# Altium PCB Saleem_PCB.PcbDoc (part 1 of 3)
Units mil, origin at the board's own origin, x right, y up, seen from the top; angles counter-clockwise.
Board outline 2705.54 x 1767 mil, 2 copper layers (Top Layer, Bottom Layer); 91 components, 66 nets, 321 pads, 111 vias.
Unrouted connection lines stored in the file: 1.
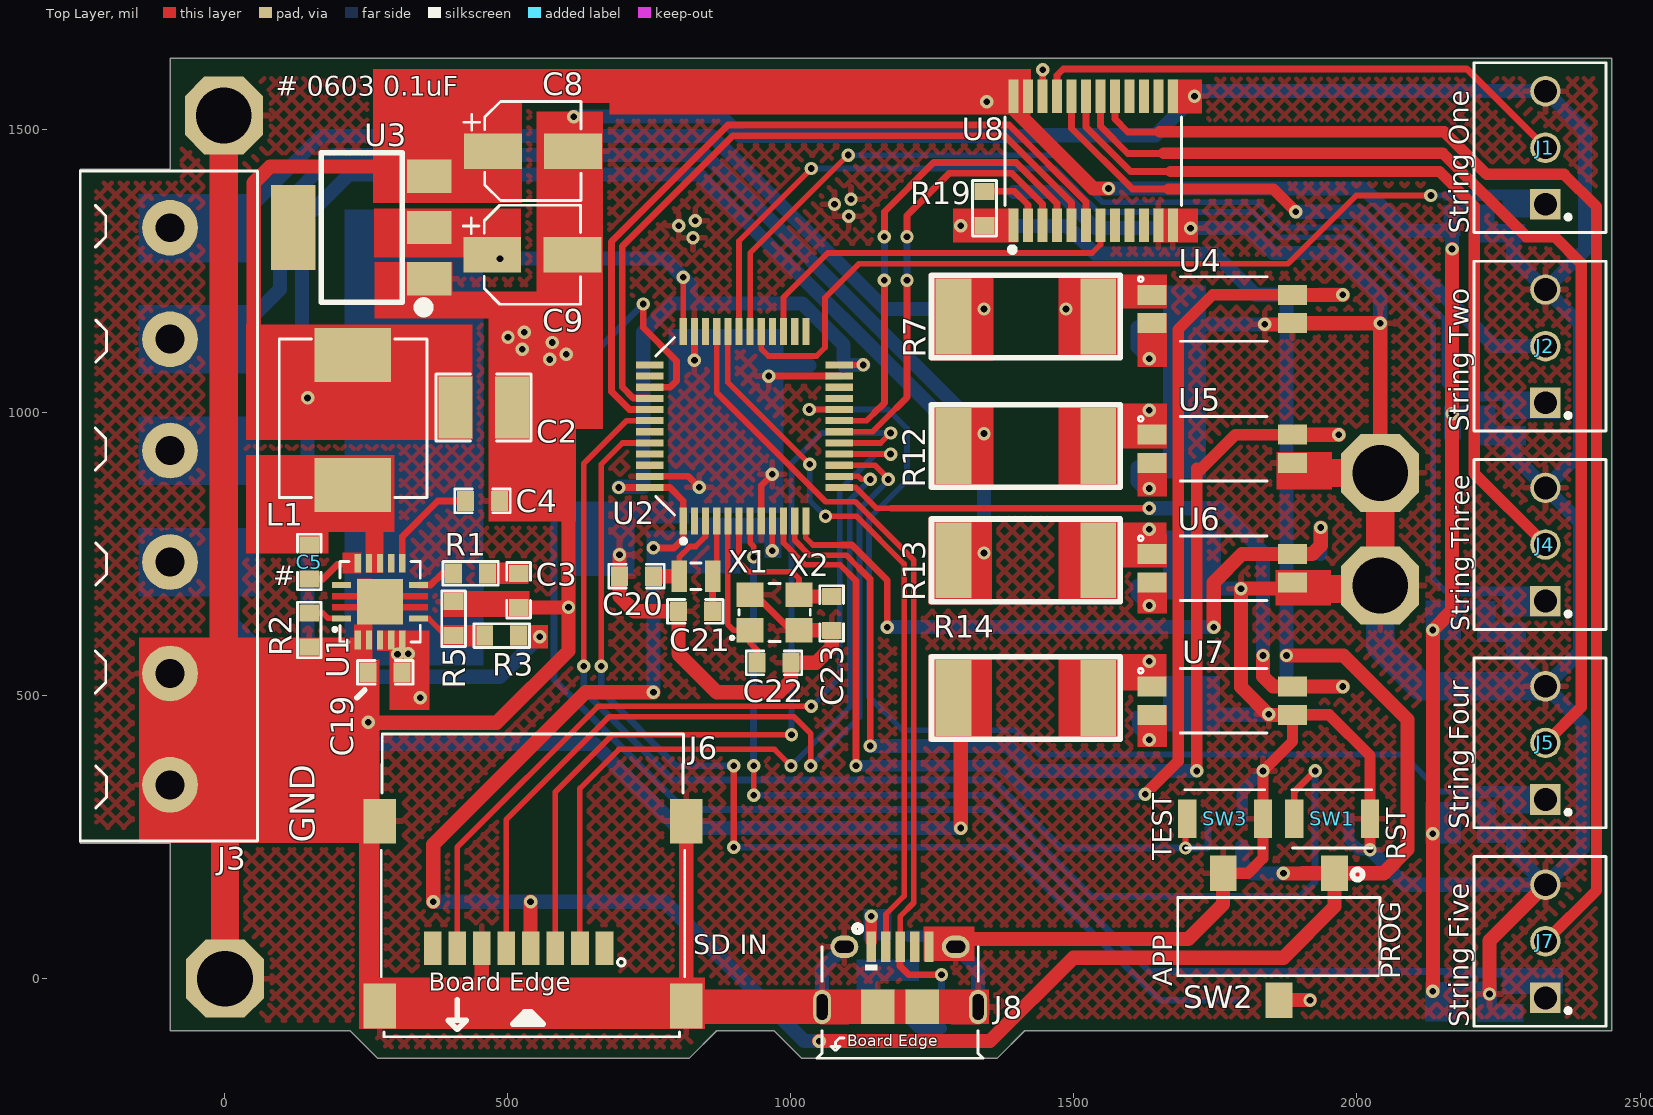
[diagram p0: Top Layer view]
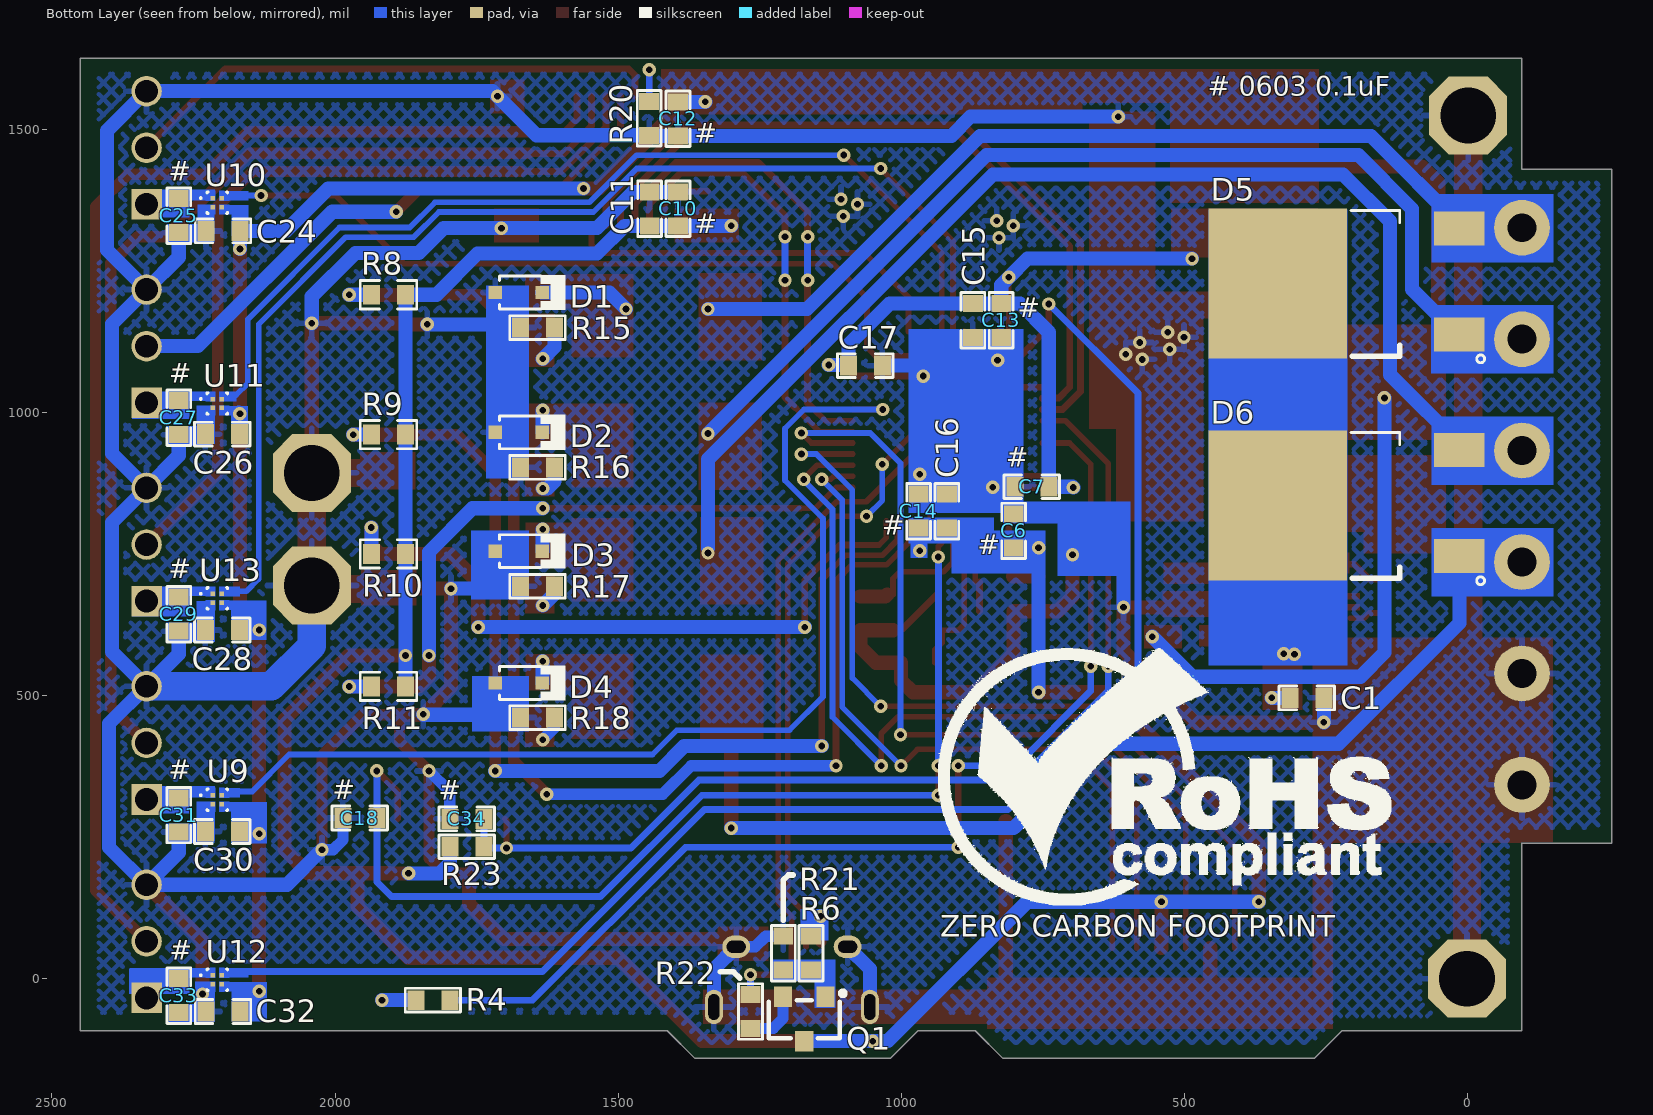
[diagram p1: Bottom Layer view, seen from below]
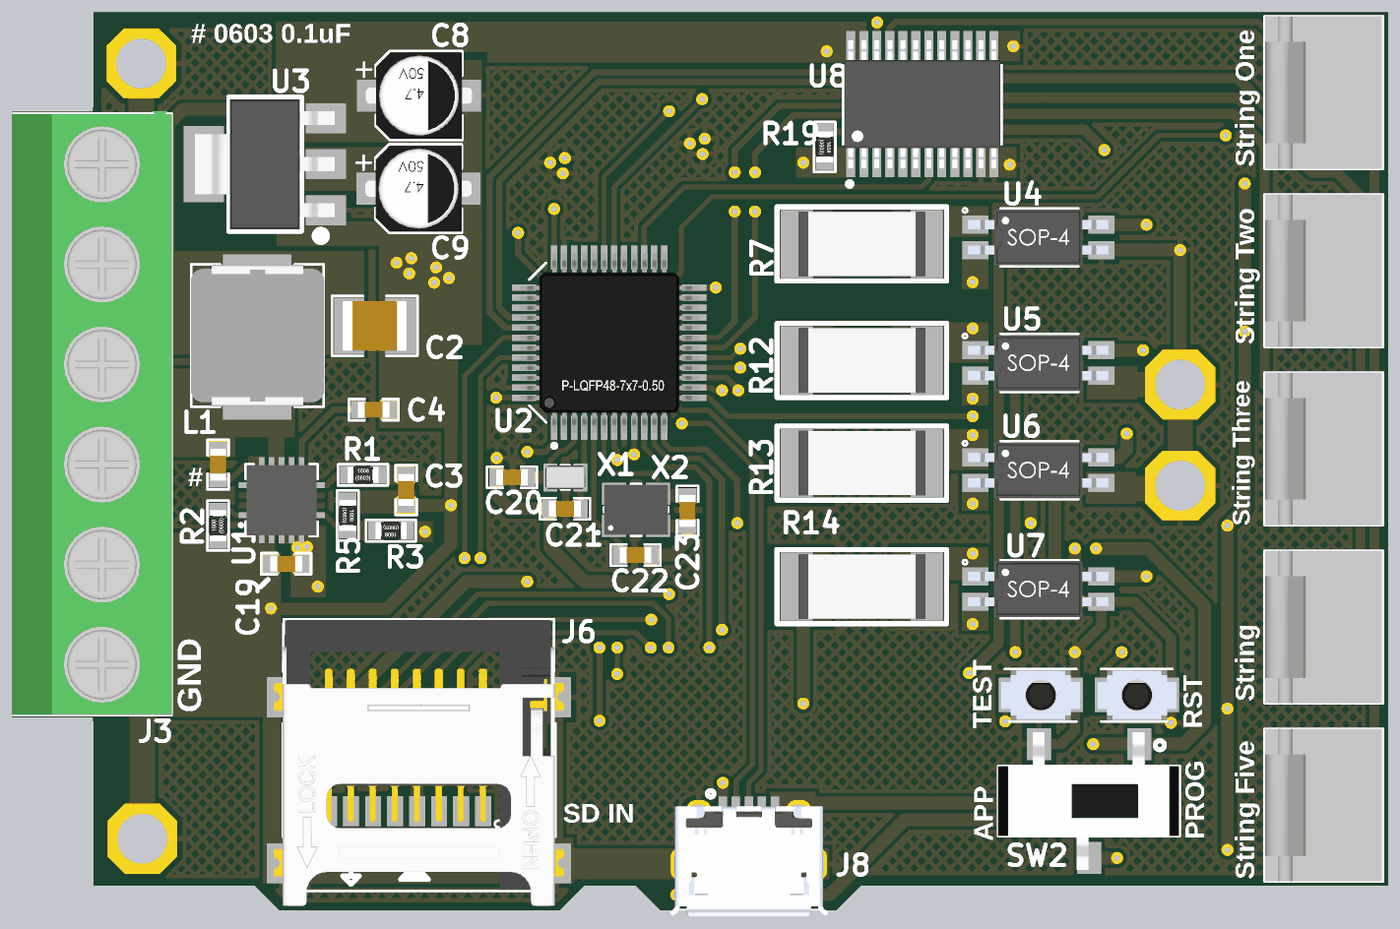
[diagram p3: 3D render of the assembled board from above, using the file's embedded part models]
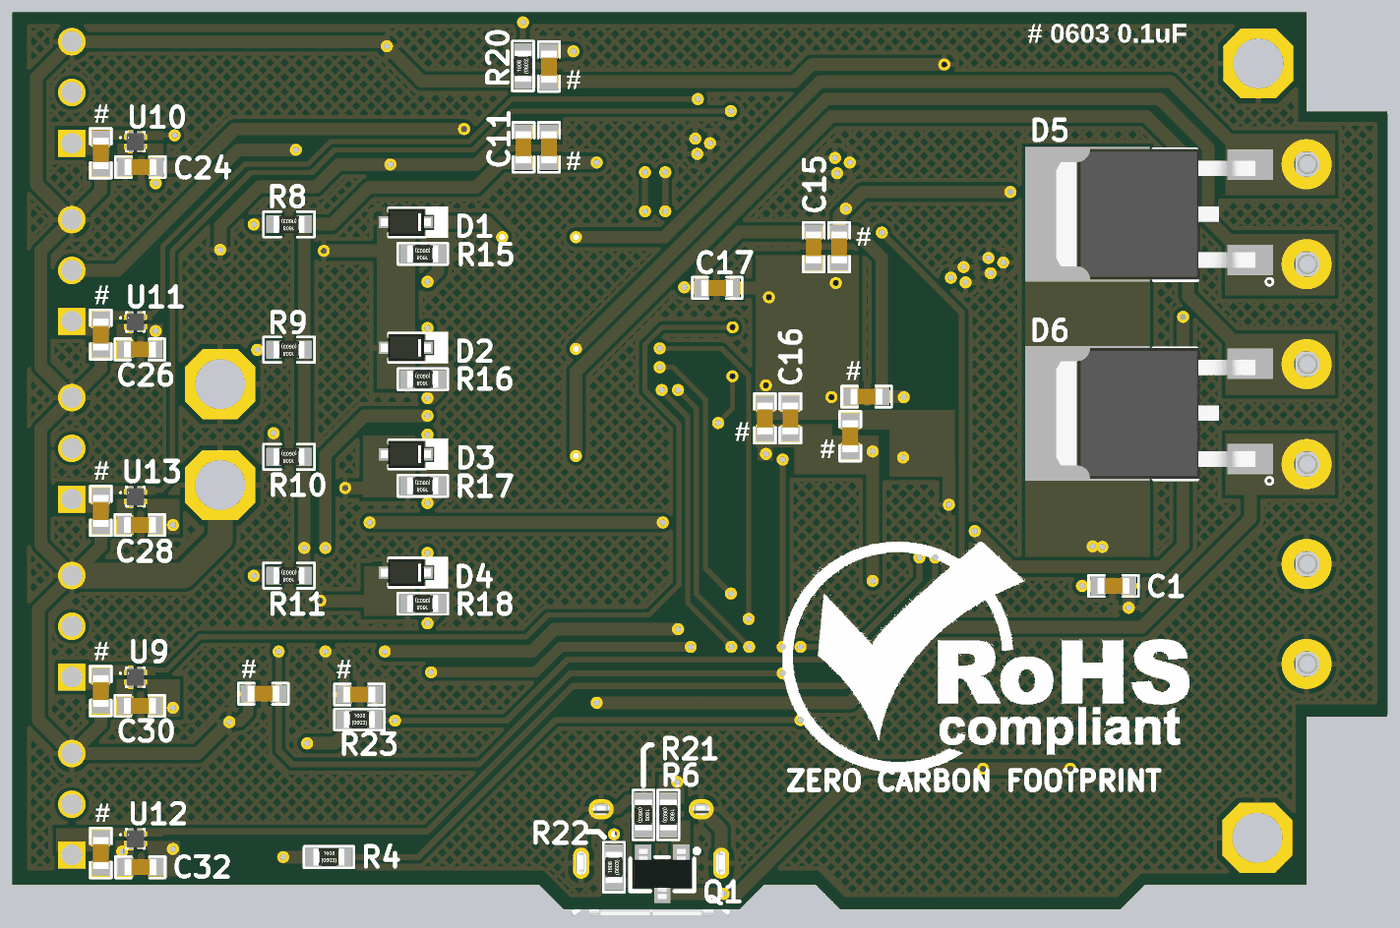
[diagram p4: 3D render of the assembled board from below, using the file's embedded part models]

## Layer stack, top to bottom
Top Solder: solder mask 0.4, Solder Resist, Dk 3.5
Top Layer: signal copper 1.4
Dielectric 1: dielectric 12.6, FR-4, Dk 4.8
Bottom Layer: signal copper 1.4
Bottom Solder: solder mask 0.4, Solder Resist, Dk 3.5

## Board outline
-97,-92 -97,239 -255.54,239 -255.54,1430 -97,1430 -97,1626 2450,1626 2450,-92 1413,-92 1364,-141 1019,-141 970,-92 869,-92 820,-141 270,-141 221,-92

## Design rules (kind name [scope] priority, off if disabled: settings)
Clearance [All] p1: gap=7 ignorepadtopadclearanceinfootprint=FALSE
ComponentClearance [All] p1: gap=0 collisioncheckmode=3 verticalgap=0 showdistances=FALSE
Height [All] p1: minheight=0 maxheight=10000 prefheight=500
HoleSize [All] p1: absolutevalues=TRUE maxlimit=1000 minlimit=1 maxpercent=80.000 minpercent=20.000
HoleToHoleClearance [All] p1: gap=1 allowstackedmicrovias=TRUE
MinimumSolderMaskSliver [All] p1: minsoldermaskwidth=0
PolygonConnect [All] p1: connectstyle=Relief reliefconductorwidth=10 reliefentries=4 polygonreliefangle="90 Angle" airgapwidth=10
RoutingVias [All] p1: holewidth=11.81 width=23.62 viastyle="Through Hole" minholewidth=11.81 minwidth=23.62 maxholewidth=31.5 maxwidth=62.99
SilkToSilkClearance [All] p1: silktosilkclearance=0
SilkToSolderMaskClearance [IsPad] p1: minsilkscreentomaskgap=0 clearancetoexposedcopper=TRUE
SolderMaskExpansion SolderMaskExpansion_1 [IsVia] p1: expansion=4 soldermaskfromhole=TRUE
SolderMaskExpansion [Not IsVia] p2: expansion=4
Width [All] p1: maxlimit=100 minlimit=8 preferedwidth=12 minimp=50.000000 maximp=50.000000 favimp=50.000000
23 further rules are at their usual default settings.

## Classes and differential pairs
component class U_Power_Section: C1 C2 C3 C4 C5 C8 C9 C19 L1 R1 R2 R3 R5 U1 U3
component class U_Opto_Section: D1 D2 D3 D4 R7 R8 R9 R10 R11 R12 R13 R14 R15 R16 R17 R18 U4 U5 U6 U7
component class U_LED_PWR_CTRL_Section: C24 C25 C26 C27 C28 C29 C30 C31 C32 C33 U9 U10 U11 U12 U13
component class U_Controller_Section: C6 C7 C13 C14 C15 C16 C17 C18 C20 C21 C22 C23 C34 R4 R23 SW1 SW2 SW3 U2 X1 X2
component class U_Connector_Section: C10 C11 C12 D5 D6 J1 J2 J3 J4 J5 J6 J7 J8 Q1 R6 R19 R20 R21 R22 U8

## Components (designator, comment, footprint, x,y, rotation, side; value= is the part's Value field where it differs from the comment)
C1 "10uF" Cap0603 283,496 r180 bottom
C2 "47uF" Cap1210 457,1009 r0 top locked
C3 "8200pF" Cap0603 519,686 r270 top locked
C4 "10000pF" Cap0603 455,844 r0 top locked
C5 "0.1uF" Cap0603 149,736 r270 top locked
C6 "0.1uF" Cap0603 801,791 r90 bottom locked
C7 "0.1uF" Cap0603 769,869 r0 bottom locked
C8 "10uF" RVT1E100M0405 544.13,1462 r0 top locked
C9 "10uF" RVT1E100M0405 543.13,1279 r0 top locked
C10 "0.1uF" Cap0603 1394,1360 r90 bottom locked
C11 "1uF" Cap0603 1444,1360 r90 bottom locked
C12 "0.1uF" Cap0603 1394,1519 r270 bottom locked
C13 "0.1uF" Cap0603 823,1163 r270 bottom locked
C14 "0.1uF" Cap0603 969,826 r90 bottom locked
C15 "1uF" Cap0603 873,1163 r270 bottom locked
C16 "4.7uF" Cap0603 919,826 r90 bottom locked
C17 "10000pF" Cap0603 1063,1083 r180 bottom locked
C18 "0.1uF" Cap0603 1956.02,283.75 r0 bottom locked
C19 "4.7uF" Cap0603 283,541 r180 top locked
C20 "10pF" Cap0603 727,711 r0 top locked
C21 "10pF" Cap0603 831,649 r0 top locked
C22 "20pF" Cap0603 970,558 r180 top locked
C23 "20pF" Cap0603 1072,645 r90 top locked
C24 "1uF" Cap0603 2198,1321 r0 bottom locked
C25 "0.1uF" Cap0603 2276,1348 r270 bottom locked
C26 "1uF" Cap0603 2199,962 r0 bottom locked
C27 "0.1uF" Cap0603 2276,991 r270 bottom locked
C28 "1uF" Cap0603 2199,616 r0 bottom locked
C29 "0.1uF" Cap0603 2276,644 r270 bottom locked
C30 "1uF" Cap0603 2199,260 r0 bottom locked
C31 "0.1uF" Cap0603 2276,289 r270 bottom locked
C32 "1uF" Cap0603 2198,-58 r0 bottom locked
C33 "0.1uF" Cap0603 2276,-30 r270 bottom locked
C34 "0.1uF" Cap0603 1767,282.25 r0 bottom locked
D1 "MM3Z3V3B" MM3Z3V3B 1675.51,1212.27 r180 bottom locked
D2 "MM3Z3V3B" MM3Z3V3B 1675.51,965.27 r180 bottom
D3 "MM3Z3V3B" MM3Z3V3B 1675.51,755.27 r180 bottom
D4 "MM3Z3V3B" MM3Z3V3B 1675.51,522.27 r180 bottom locked
D5 "VS-12CWQ06FNTR-M3" VS-12CWQ06FNTR-M3 174,1232 r90 bottom locked
D6 "VS-12CWQ06FNTR-M3" VS-12CWQ06FNTR-M3 174,840 r90 bottom locked
J1 "640456-3" 640456-3 2333,1468 r90 top locked
J2 "640456-3" 640456-3 2333,1117.5 r90 top locked
J3 "WJ126V-5.0-6P" WJ126V-5.0-6P -97,834.5 r270 top locked
J4 "640456-3" 640456-3 2333,767 r90 top locked
J5 "640456-3" 640456-3 2333,416.5 r90 top locked
J6 "TF-002T-15" TF-002T-15 670.31,54 r0 top locked
J7 "640456-3" 640456-3 2333,66 r90 top locked
J8 "10118194-0001LF" 10118194-0001LF 1192.8,56.3 r0 top locked
L1 "3.3 µH" IHLP2525CZER3R3M01 226,988 r90 top locked
Q1 "MMBT2222A-7-F" SOT-23 1171,-71 r0 bottom locked
R1 "1K69" Res0603#1 434,716 r180 top locked
R2 "100K" Res0603#1 149,616 r270 top locked
R3 "56K" Res0603#1 489,606 r0 top locked
R4 "10K" Res0603#1 1827,-38 r0 bottom locked
R5 "10K" Res0603#1 404,636 r90 top locked
R6 "10K" Res0603#1 1159,45 r90 bottom locked
R7 "390R" "RES 2512" 1415,1170 r180 top value=390O
R8 "3.3K" Res0603#2 1905.51,1208.27 r0 bottom locked
R9 "3.3K" Res0603#2 1905.51,961.27 r0 bottom locked
R10 "3.3K" Res0603#2 1905.51,750.27 r0 bottom locked
R11 "3.3K" Res0603#2 1905.51,516.27 r0 bottom locked
R12 "390R" "RES 2512" 1415,941 r180 top value=390O
R13 "390R" "RES 2512" 1415,739 r180 top value=390O
R14 "390R" "RES 2512" 1415,496 r180 top value=390O
R15 "200R" Res0603#1 1642.3,1150.27 r180 bottom locked
R16 "200R" Res0603#1 1642.3,903.27 r180 bottom locked
R17 "200R" Res0603#1 1642.3,693.27 r180 bottom locked
R18 "200R" Res0603#1 1642.3,461.27 r180 bottom locked
R19 "10K" Res0603#1 1342,1361 r90 top locked
R20 "10K" Res0603#1 1445,1520 r270 bottom locked
R21 "36K" Res0603#1 1208,45 r90 bottom locked
R22 "1.5K" Res0603#1 1266,-58 r270 bottom locked
R23 "10K" Res0603#1 1767,233 r0 bottom locked
SW1 "B3U-1000P" B3U-1000P 1956.02,282.75 r0 top locked
SW2 "SS-3235D-03-L2" SS-3235D-03-L2 1862,74 r180 top locked
SW3 "B3U-1000P" B3U-1000P 1767,282.75 r0 top locked
U1 "TPS54620RHLR" "14-VQFN (3.5x3.5)" 274,666 r90 top locked
U2 "STM32F070CBT6TR" "48-LQFP (7x7)" 918,976 r90 top locked
U3 "NCP1117LPST33T3G" SOT-223 241,1327 r90 top locked
U4 "PS2801C-1-F3-A" PS2801C-1-F3-A 1762,1183 r0 top locked
U5 "PS2801C-1-F3-A" PS2801C-1-F3-A 1762,936 r0 top locked
U6 "PS2801C-1-F3-A" PS2801C-1-F3-A 1762,725 r0 top locked
U7 "PS2801C-1-F3-A" PS2801C-1-F3-A 1762,491 r0 top locked
U8 "SN74LVC8T245PWR" 24-TSSOP 1534,1445 r90 top locked
U9 "MIC94082YFT-TR" MIC94082YFT-TR 2207.87,316.13 r180 bottom locked
U10 "MIC94082YFT-TR" MIC94082YFT-TR 2207.87,1371 r180 bottom locked
U11 "MIC94082YFT-TR" MIC94082YFT-TR 2207.87,1016.13 r180 bottom locked
U12 "MIC94082YFT-TR" MIC94082YFT-TR 2207.87,-1.87 r180 bottom locked
U13 "MIC94082YFT-TR" MIC94082YFT-TR 2207.87,671.87 r180 bottom locked
X1 "32.768 KHz" X1A000061002100 832,711 r0 top locked value=Custom
X2 "XXDCCLNANF-8.000000MHZ" XXDCCLNANF-8.000000MHZ 971,647 r0 top locked value=8000000Hz

## Footprints (in the part's own frame and the unit in brackets; to place one, negate y for a bottom-side part, rotate by r counter-clockwise, add the part's x,y. Pads: shape width x height; smd on the part's side, far side on the other; paste and mask are expansions set on the pad)
"14-VQFN (3.5x3.5)" [mm]
  rect 0.28x0.85 smd: 1(-0.75,1.725) 7(-0.75,-1.725) 8(0.75,-1.725) 14(0.75,1.725)
  rect 0.85x0.28 smd: 2(-1.725,1) 3(-1.725,0.5) 4(-1.725,0) 5(-1.725,-0.5) 6(-1.725,-1) 9(1.725,-1) 10(1.725,-0.5) 11(1.725,0) 12(1.725,0.5) 13(1.725,1)
  rect 2.05x2.05 smd: 15(0,0)
  Top Layer region: 0.097,-0.949 0.097,-2.149 0.39,-2.149 0.39,-0.949
  Top Layer region: -0.403,-0.949 -0.403,-2.149 -0.11,-2.149 -0.11,-0.949
  Top Layer region: 0.39,0.949 0.39,2.149 0.097,2.149 0.097,0.949
  Top Layer region: -0.11,0.949 -0.11,2.149 -0.403,2.149 -0.403,0.949
  silkscreen extent -1.8,-1.8 1.8,2.06, body extent -1.75,-1.75 1.75,1.75, height 1
24-TSSOP [mm]
  rect 1.5x0.45 smd: 1(-2.9,3.575) 2(-2.9,2.925) 3(-2.9,2.275) 4(-2.9,1.625) 5(-2.9,0.975) 6(-2.9,0.325) 7(-2.9,-0.325) 8(-2.9,-0.975) 9(-2.9,-1.625) 10(-2.9,-2.275) 11(-2.9,-2.925) 12(-2.9,-3.575) 13(2.9,-3.575) 14(2.9,-2.925) 15(2.9,-2.275) 16(2.9,-1.625) 17(2.9,-0.975) 18(2.9,-0.325) 19(2.9,0.325) 20(2.9,0.975) 21(2.9,1.625) 22(2.9,2.275) 23(2.9,2.925) 24(2.9,3.575)
  silkscreen extent -4.1,-3.96 1.96,3.96, body extent -3.2,-3.9 3.2,3.9, height 1.2
"48-LQFP (7x7)" [mm]
  rect 1.22x0.32 smd: 1(-4.25,2.75) 2(-4.25,2.25) 3(-4.25,1.75) 4(-4.25,1.25) 5(-4.25,0.75) 6(-4.25,0.25) 7(-4.25,-0.25) 8(-4.25,-0.75) 9(-4.25,-1.25) 10(-4.25,-1.75) 11(-4.25,-2.25) 12(-4.25,-2.75) 25(4.25,-2.75) 26(4.25,-2.25) 27(4.25,-1.75) 28(4.25,-1.25) 29(4.25,-0.75) 30(4.25,-0.25) 31(4.25,0.25) 32(4.25,0.75) 33(4.25,1.25) 34(4.25,1.75) 35(4.25,2.25) 36(4.25,2.75)
  rect 0.32x1.22 smd: 13(-2.75,-4.25) 14(-2.25,-4.25) 15(-1.75,-4.25) 16(-1.25,-4.25) 17(-0.75,-4.25) 18(-0.25,-4.25) 19(0.25,-4.25) 20(0.75,-4.25) 21(1.25,-4.25) 22(1.75,-4.25) 23(2.25,-4.25) 24(2.75,-4.25) 37(2.75,4.25) 38(2.25,4.25) 39(1.75,4.25) 40(1.25,4.25) 41(0.75,4.25) 42(0.25,4.25) 43(-0.25,4.25) 44(-0.75,4.25) 45(-1.25,4.25) 46(-1.75,4.25) 47(-2.25,4.25) 48(-2.75,4.25)
  silkscreen extent -5.23,2.67 3.99,3.99, body extent -4.51,-4.51 4.49,4.49, height 1.43
640456-3 [mm]
  rect 1.37x1.37 hole 1.02: 1(-2.54,0)
  round 1.37 hole 1.02: 2(0,0) 3(2.54,0)
  silkscreen extent -3.81,-2.72 3.81,3.2, body extent -3.81,-2.67 3.81,3.18, height 10.49
10118194-0001LF [mm]
  rect 0.42x1.35 smd: 1(-1.3,0) 2(-0.65,0) 3(0,0) 4(0.65,0) 5(1.3,0)
  oval 1.25x1 hole 0.55 slot 0.85 at 0 deg: MH1(-2.5,0) MH2(2.5,0)
  oval 0.8x1.55 hole 0.5 slot 1.15 at 90 deg: MH3(-3.5,-2.7) MH4(3.5,-2.7)
  rect 1.5x1.55 smd: MP1(-1,-2.7) MP2(1,-2.7)
  Top Layer region: 191 vertices and 0 holes, not listed, extent -4,-3.475 -2.3,-1.92
  Top Layer region: 191 vertices and 0 holes, not listed, extent 2.3,-3.48 4,-1.925
  silkscreen extent -3.73,-5 3.72,0.98, body extent -7.67,-5.34 4.03,0.19, height 2.69
B3U-1000P [mm] "SWITCH TACTILE SPST-NO 0.05A 12V"
  rect 0.82x1.72 smd: 1(-1.7,0) 2(1.7,0)
  silkscreen extent -1.8,-1.32 1.78,1.3, body extent -2,-1.26 2,1.24, height 1.6
Cap0603 [mil]
  rect 30x35 smd mask+2.36: 1(-30,0) 2(30,0)
  silkscreen extent -49,-21 49,21, body extent -32,-16 31,16, height 34
Cap1210 [mil] "SMD 1210"
  rect 60x110 smd: 1(-50,0) 2(50,0)
  silkscreen extent -84,-59 84,59, body extent -63,-49 63,49, height 39
IHLP2525CZER3R3M01 [mil] "6A 3.3uH ±20% 28mO SMD Power Inductors ROHS"
  rect 95x135 smd: 1(-116,0) 2(114,0)
  silkscreen extent -138,-131 142,130, body extent -137,-132 141,131, height 115
MIC94082YFT-TR [mm]
  rect 0.2x0.2 smd paste-1 mask+0: 1(-0.2,0.2) 2(-0.2,-0.2) 3(0.2,-0.2) 4(0.2,0.2)
  Top Layer region: -0.09,0.09 -0.53,0.09 -0.53,0.32 -0.32,0.32 -0.32,0.53 -0.09,0.53
  Top Layer region: 0.53,-0.32 0.32,-0.32 0.32,-0.53 0.09,-0.53 0.09,-0.09 0.53,-0.09
  Top Layer region: -0.09,-0.53 -0.32,-0.53 -0.32,-0.32 -0.53,-0.32 -0.53,-0.09 -0.09,-0.09
  Top Layer region: 0.32,0.32 0.53,0.32 0.53,0.09 0.09,0.09 0.09,0.53 0.32,0.53
  silkscreen extent -0.76,-0.48 0.46,0.48, body extent -0.42,-0.42 0.43,0.43, height 0.6
MM3Z3V3B [mm] "DIODE ZENER 3.3V 200MW SOD323F"
  rect 0.6x0.6 smd: 1(-1.05,0) 2(1.05,0)
  silkscreen extent -0.86,-0.79 2.11,0.79, body extent -1.25,-0.67 1.25,0.68, height 1
PS2801C-1-F3-A [mm]
  rect 1.3x0.9 smd: 1(-3.15,0.635) 2(-3.15,-0.635) 3(3.15,-0.635) 4(3.15,0.635)
  silkscreen extent -3.77,-1.45 2,1.45, body extent -3.5,-1.4 3.5,1.4, height 2.1
Res0603#1 [mil]
  rect 30x35 smd: 1(-30,0) 2(30,0)
  silkscreen extent -49,-21 49,21, body extent -31,-17 31,17, height 18
Res0603#2 [mil]
  rect 30x35 smd: 1(30,0) 2(-30,0)
  silkscreen extent -50,-25 50,25, body extent -31,-17 31,17, height 18
"RES 2512" [mm] "0.033O ±1% 2W ±1800ppm/°C 2512 Low Resistors & Current Sense Resistors - Surface Mount RoHS"
  rect 1.6x3.4 smd: 1(-3.25,0) 2(3.25,0)
  silkscreen extent -4.24,-1.85 4.24,1.85, body extent -3.17,-1.63 3.18,1.63, height 0.58
RVT1E100M0405 [mm] "10uF 25V 5.4mm SMD"
  rect 2.6x1.6 smd: 1(-1.8,0) 2(1.8,0)
  silkscreen extent -3.1,-2.22 2.16,2.22, body extent -2.65,-2.15 2.65,2.15, height 5.7
SOT-23 [mm] "TRANS NPN 40V 0.6A SOT23"
  rect 0.82x0.92 smd: 1(-0.95,-1) 2(0.95,-1) 3(0,1)
  silkscreen extent -1.82,-1.23 1.6,0.86, body extent -1.5,-1.25 1.5,1.25, height 1.05
SOT-223 [mm]
  rect 1.5x2 smd: 1(-2.3,-3.05) 2(0,-3.05) 3(2.3,-3.05)
  rect 3.8x2 smd: 4(0,3.05)
  silkscreen extent -3.78,-3 3.35,1.8, body extent -3.25,-3.5 3.25,3.5, height 1.61
SS-3235D-03-L2 [mm] "SPDT 50mA @ 12VDC 12V On-On SMD Toggle Switches RoHS"
  rect 1.2x1.6 smd: 1(-2.5,-2.85) 3(2.5,-2.85)
  rect 1.21x1.6 smd: 2(0,2.85)
  silkscreen extent -4.53,-3.02 4.54,1.75, body extent -4.5,-3.45 4.55,3.45, height 6.4
TF-002T-15 [mm] "SMD SD Card Connectors ROHS"
  rect 0.8x1.5 smd: 1(0,0) 2(-1.1,0) 3(-2.2,0) 4(-3.3,0) 5(-4.4,0) 6(-5.5,0) 7(-6.6,0) 8(-7.7,0)
  rect 1.45x2 smd: MP1(3.675,-2.6) MP2(-10.075,-2.6) MP3(3.675,5.7) MP4(-10.075,5.7)
  silkscreen extent -10.01,-3.98 3.61,9.6, body extent -10.46,-4.74 4.04,9.56, height 1.8
VS-12CWQ06FNTR-M3 [mm] "DIODE ARRAY SCHOTTKY 60V 6A DPAK"
  rect 1.524x2.28 smd: 1(-2.38,-4.072) 3(2.38,-4.072)
  rect 6.74x6.23 smd: 4(-0.1,4.073)
  silkscreen extent -3.66,-5.21 3.17,0.79, body extent -3.37,-4.31 3.17,5.63, height 2.39
WJ126V-5.0-6P [mm]
  round 2.5 hole 1.3: 1(-12.5,0) 2(-7.5,0) 3(-2.5,0) 4(2.5,0) 5(7.5,0) 6(12.5,0)
  silkscreen extent -15.04,-4.03 15.02,3.93, body extent -15.15,-4.05 15,3.95, height 10
X1A000061002100 [mm]
  rect 0.7x1.4 smd: 1(-0.75,0) 2(0.75,0)
  silkscreen extent -0.23,-0.6 0.23,0.6, body extent -1,-0.6 1,0.6, height 0.6
XXDCCLNANF-8.000000MHZ [mm]
  rect 1.2x1.1 smd: 1(-1.1,-0.8) 2(1.1,-0.8) 3(1.1,0.8) 4(-1.1,0.8)
  silkscreen extent -1.99,-1.3 1.6,1.3, body extent -1.6,-1.25 1.6,1.25, height 0.91

## Part data
C1: library part GRM188R6YA106MA73D, "CAP CER 10UF 35V X5R 0603", Case/Package=0603, Case Code (Metric)=1608, Dielectric=X5R, Manufacturer=Murata, Max Operating Temperature=85°C, Min Operating Temperature=-55°C, Supplier Part Number 1=490-13248-6-ND, Tolerance=20%, Voltage Rating=35V, Capacitance=10uF, Case Code (Imperial)=0603, ComponentLink1Description=http://search.murata.co.jp/Ceramy/image/img/A01X/G101/ENG/GRM188R6YA106MA73-01.pdf?src-supplier=Digi-Key, ComponentLink1URL=http://search.murata.co.jp/Ceramy/image/img/A01X/G101/ENG/GRM188R6YA106MA73-01.pdf?src-supplier=Digi-Key, ComponentLink2Description=http://search.murata.co.jp/Ceramy/image/img/A01X/G101/ENG/GRM188R6YA106MA73-01.pdf?src-supplier=Mouser, ComponentLink2URL=http://search.murata.co.jp/Ceramy/image/img/A01X/G101/ENG/GRM188R6YA106MA73-01.pdf?src-supplier=Mouser, ComponentLink3Description=https://www.murata.com/~/media/webrenewal/support/library/catalog/products/capacitor/mlcc/c02e.ashx?la=en-us&src-supplier=Digi-Key, ComponentLink3URL=https://www.murata.com/~/media/webrenewal/support/library/catalog/products/capacitor/mlcc/c02e.ashx?la=en-us&src-supplier=Digi-Key, ComponentLink4Description=http://search.murata.co.jp/Ceramy/image/img/A01X/G101/ENG/GRM188R6YA106MA73-01.pdf?src-supplier=Future+Electronics, ComponentLink4URL=http://search.murata.co.jp/Ceramy/image/img/A01X/G101/ENG/GRM188R6YA106MA73-01.pdf?src-supplier=Future+Electronics, ComponentLink5Description=http://search.murata.co.jp/Ceramy/image/img/A01X/G101/ENG/GRM188R6YA106MA73-01.pdf?src-supplier=TTI, ComponentLink5URL=http://search.murata.co.jp/Ceramy/image/img/A01X/G101/ENG/GRM188R6YA106MA73-01.pdf?src-supplier=TTI, Length=0.063inch, Manufacturer Part Number=GRM188R6YA106MA73D, Mount="Surface Mount", Packaging="Tape and Reel", Pricing 1="1=0.5, 10=0.346, 100=0.2076, 500=0.1557, 1000=0.13148 (USD)", Stock 1=11640, Supplier 1=Digi-Key, Thickness=0.039inch, Voltage Rating (DC)=35V, Width=0.031inch
C2: library part TMK325ABJ476MM-P, "CAP CER 47uF 25V 1210", Case/Package=Ceramic, Dielectric=X5R, Manufacturer="Taiyo Yuden", Max Operating Temperature=85°C, Min Operating Temperature=-55°C, Supplier Part Number 1=1782936, Tolerance=20%, Capacitance=47uF, Category="Ceramic Capacitors", ComponentLink1Description=http://www.yuden.co.jp/productdata/catalog/en/mlcc_all_e.pdf?src-supplier=Avnet+Asia, ComponentLink1URL=http://www.yuden.co.jp/productdata/catalog/en/mlcc_all_e.pdf?src-supplier=Avnet+Asia, ComponentLink2Description=http://ds.yuden.co.jp/TYCOMPAS/ut/detail.do?productNo=TMK325ABJ476MM-P&fileName=TMK325ABJ476MM-P_SS&mode=specSheetDownload&src-supplier=Digi-Key, ComponentLink2URL=http://ds.yuden.co.jp/TYCOMPAS/ut/detail.do?productNo=TMK325ABJ476MM-P&fileName=TMK325ABJ476MM-P_SS&mode=specSheetDownload&src-supplier=Digi-Key, ComponentLink3Description="https://ds.yuden.co.jp/TYCOMPAS/ut/detail?pn=TMK325ABJ476MM-P &amp;u=M&src-supplier=Digi-Key", ComponentLink3URL="https://ds.yuden.co.jp/TYCOMPAS/ut/detail?pn=TMK325ABJ476MM-P &amp;u=M&src-supplier=Digi-Key", Contact Plating=Tin, Lead Free="Lead Free", Length=3.2mm, Manufacturer Part Number=TMK325ABJ476MM-P, Mount="Surface Mount", Packaging="Tape and Reel", Pricing 1="1000=0.37500 (GBP)", RoHS=Yes, RoHS Compliant=Yes, Stock 1=1000, Supplier 1=RSComponents, Termination=Wraparound
C3: library part CC0603KRX7R9BB822, "CAP CER 8.2nF 50V X7R 10% 0603", Capacitance=8.2nF, Case/Package=0603, Case Code (Metric)=1608, Dielectric=X7R, Dielectric Material=Ceramic, Insulation Resistance=100GR, Manufacturer=Yageo, Max Operating Temperature=125°C, Min Operating Temperature=-55°C, Supplier Part Number 1=311-1811-1-ND, Tolerance=10%, Voltage Rating=50V, Case Code (Imperial)=0603, Category="Ceramic Capacitors", ComponentLink1Description=https://datasheet.ciiva.com/11465/upy-gphc-x7r-6-3v-to-50v-8-11465276.pdf?src-supplier=Avnet, ComponentLink1URL=https://datasheet.ciiva.com/11465/upy-gphc-x7r-6-3v-to-50v-8-11465276.pdf?src-supplier=Avnet, ComponentLink2Description=https://datasheet.ciiva.com/17434/upy-gphc-x7r-6-3v-to-50v-8-17434493.pdf?src-supplier=Avnet+Europe, ComponentLink2URL=https://datasheet.ciiva.com/17434/upy-gphc-x7r-6-3v-to-50v-8-17434493.pdf?src-supplier=Avnet+Europe, ComponentLink3Description=https://datasheet.ciiva.com/8033/1489800-8033887.pdf?src-supplier=Element14, ComponentLink3URL=https://datasheet.ciiva.com/8033/1489800-8033887.pdf?src-supplier=Element14, ComponentLink4Description=https://datasheet.ciiva.com/13208/upy-gphc-x7r-6-3v-to-50v-8-12304-13208847.pdf?src-supplier=Mouser, ComponentLink4URL=https://datasheet.ciiva.com/13208/upy-gphc-x7r-6-3v-to-50v-8-12304-13208847.pdf?src-supplier=Mouser, Construction=Flat, Depth=0.8mm, Halogen Free="Halogen Free", Height=0.8mm, Lead Free="Lead Free", Length=1.6mm, Manufacturer Part Number=CC0603KRX7R9BB822, Mount="Surface Mount", Packaging="Tape and Reel", Pricing 1="1=0.10000, 10=0.07300, 50=0.03980, 100=0.03250, 500=0.02318, 1000=0.01822 (USD)", Radiation Hardening=No, REACH SVHC=Unknown, Resistor Type=Ceramic, RoHS=Yes, RoHS Compliant=Yes, Series=CC, Stock 1=31159, Supplier 1=Digi-Key, Termination=SMD/SMT, Thickness=0.035inch, Voltage Rating (DC)=50V, Weight=7.1E-05oz, Width=0.031inch
C4 C17: library part CC0603KRX7R9BB103, "CAP CER 10000PF 50V X7R 0603", Capacitance=10nF, Case/Package=0603, Case Code (Metric)=1608, Dielectric=X7R, Insulation Resistance=100GR, Manufacturer=Yageo, Max Operating Temperature=125°C, Min Operating Temperature=-55°C, Package Quantity=1, Supplier Part Number 1=311-1085-6-ND, Tolerance=10%, Voltage=50V, Case Code (Imperial)=0603, ComponentLink1Description=http://www.farnell.com/datasheets/1734573.pdf?src-supplier=Element14, ComponentLink1URL=http://www.farnell.com/datasheets/1734573.pdf?src-supplier=Element14, ComponentLink2Description=http://www.yageo.com/documents/recent/UPY-GPHC_X7R_6.3V-to-50V_18.pdf?src-supplier=Digi-Key, ComponentLink2URL=http://www.yageo.com/documents/recent/UPY-GPHC_X7R_6.3V-to-50V_18.pdf?src-supplier=Digi-Key, ComponentLink3Description=http://www.farnell.com/datasheets/2167236.pdf?src-supplier=Mouser, ComponentLink3URL=http://www.farnell.com/datasheets/2167236.pdf?src-supplier=Mouser, ComponentLink4Description=http://www.farnell.com/datasheets/70765.pdf?src-supplier=Element14, ComponentLink4URL=http://www.farnell.com/datasheets/70765.pdf?src-supplier=Element14, ComponentLink5Description=http://www.yageo.com/documents/recent/UPY-GPHC_X7R_6.3V-to-50V_8.pdf?src-supplier=Avnet+Europe, ComponentLink5URL=http://www.yageo.com/documents/recent/UPY-GPHC_X7R_6.3V-to-50V_8.pdf?src-supplier=Avnet+Europe, ComponentLink6Description=http://www.farnell.com/datasheets/1489800.pdf?src-supplier=Element14, ComponentLink6URL=http://www.farnell.com/datasheets/1489800.pdf?src-supplier=Element14, ComponentLink7Description=https://www.verical.com/server-webapp/html/getDatasheet?partID=403582&src-supplier=Verical, ComponentLink7URL=https://www.verical.com/server-webapp/html/getDatasheet?partID=403582&src-supplier=Verical, Composition=Ceramic, Depth=0.8mm, Halogen Free="Halogen Free", Height=0.8mm, Lead Free="Lead Free", Length=1.6mm, Manufacturer Part Number=CC0603KRX7R9BB103, Material=Ceramic, Mount="Surface Mount", Number of Pins=2, Packaging="Tape and Reel", Pricing 1="1=0.1, 10=0.038, 100=0.0171, 500=0.01224, 1000=0.00962 (USD)", Radiation Hardening=No, REACH SVHC="No SVHC", Stock 1=8411467, Supplier 1=Digi-Key, Termination=SMD/SMT, Thickness=0.035inch, Voltage Rating=50V, Voltage Rating (DC)=50V, Width=0.031inch
C5 C6 C7 C10 C12 C13 C14 C18 C25 C27 C29 C31 C33: library part CC0603KRX7R0BB104, "CAP CER 0.1UF 100V X7R 0603", Capacitance=100nF, Case/Package=0603, Case Code (Metric)=1608, Dielectric=X7R, Manufacturer=Yageo, Max Operating Temperature=125°C, Min Operating Temperature=-55°C, Package Quantity=4000, Resistor Type=Ceramic, Supplier Part Number 1=311-1523-1-ND, Tolerance=10%, Voltage Rating=100V, Case Code (Imperial)=0603, Category="Ceramic Capacitors", ComponentLink1Description=https://datasheet.ciiva.com/6277/mlccorderingcode-6277030.pdf?src-supplier=Digi-Key, ComponentLink1URL=https://datasheet.ciiva.com/6277/mlccorderingcode-6277030.pdf?src-supplier=Digi-Key, ComponentLink2Description=https://datasheet.ciiva.com/6277/mlccorderingcode-6277081.pdf?src-supplier=Digi-Key, ComponentLink2URL=https://datasheet.ciiva.com/6277/mlccorderingcode-6277081.pdf?src-supplier=Digi-Key, ComponentLink3Description=https://datasheet.ciiva.com/6277/mlccorderingcode-6277082.pdf?src-supplier=Digi-Key, ComponentLink3URL=https://datasheet.ciiva.com/6277/mlccorderingcode-6277082.pdf?src-supplier=Digi-Key, Depth=0.8mm, Lead Free="Lead Free", Length=0.063inch, Manufacturer Part Number=CC0603KRX7R0BB104, Mount="Surface Mount", Packaging="Tape and Reel", Pricing 1="1=0.19000, 10=0.13500, 50=0.07680, 100=0.06370, 500=0.04466, 1000=0.03696 (USD)", RoHS=Yes, RoHS Compliant=Yes, Series=CC, Stock 1=60476, Supplier 1=Digi-Key, Termination=SMD/SMT, Thickness=0.035inch, Voltage Rating (DC)=100V, Weight=7.1E-05oz, Width=0.031inch
C8 C9: library part RVT1E100M0405, "CAP ALUM 10uF 25V SMD", Manufacturer=ROQANG, Operating Temperature=-45?~+105?, Rated Voltage=25V, Tolerance=±20%, Capacitance=10uF, L=5.4mm, fD=4mm
C11 C15 C24 C26 C28 C30 C32: library part CC0603KRX5R8BB105, "CAP CER 1UF 25V X5R 0603", Case/Package=0603, Case Code (Metric)=1608, Dielectric=X5R, Manufacturer=Yageo, Max Operating Temperature=85°C, Min Operating Temperature=-55°C, Package Quantity=1, Supplier Part Number 1=311-1445-6-ND, Tolerance=10%, Voltage Rating=25V, Capacitance=1uF, Case Code (Imperial)=0603, ComponentLink1Description=http://www.yageo.com/documents/recent/UPY-GPHC_X5R_4V-to-50V_25.pdf?src-supplier=Digi-Key, ComponentLink1URL=http://www.yageo.com/documents/recent/UPY-GPHC_X5R_4V-to-50V_25.pdf?src-supplier=Digi-Key, ComponentLink2Description=http://www.yageo.com/documents/recent/UPY-GPHC_X5R_4V-to-50V_12.pdf?src-supplier=Avnet+Europe, ComponentLink2URL=http://www.yageo.com/documents/recent/UPY-GPHC_X5R_4V-to-50V_12.pdf?src-supplier=Avnet+Europe, ComponentLink3Description=http://www.farnell.com/datasheets/1525783.pdf?src-supplier=Element14, ComponentLink3URL=http://www.farnell.com/datasheets/1525783.pdf?src-supplier=Element14, ComponentLink4Description=http://www.yageo.com/documents/recent/UPY-GPHC_X5R_4V-to-50V_12.pdf?src-supplier=Avnet, ComponentLink4URL=http://www.yageo.com/documents/recent/UPY-GPHC_X5R_4V-to-50V_12.pdf?src-supplier=Avnet, Depth=0.8mm, Halogen Free="Halogen Free", Height=0.8mm, Lead Free="Lead Free", Length=1.6mm, Manufacturer Part Number=CC0603KRX5R8BB105, Mount="Surface Mount", Number of Pins=2, Packaging="Tape and Reel", Pricing 1="1=0.13, 10=0.093, 100=0.0437, 500=0.03066, 1000=0.02539 (USD)", Radiation Hardening=No, REACH SVHC="No SVHC", Stock 1=277068, Supplier 1=Digi-Key, Termination=SMD/SMT, Thickness=0.035inch, Voltage Rating (DC)=25V, Width=0.031inch
C16 C19: library part C1608X5R1E475KT000E, "CAP CER, 4.7 µF, 25 V, 0603", Case/Package=0603, Case Code (Metric)=1608, Dielectric=X5R, Dielectric Material=Ceramic, Manufacturer=TDK, Max Operating Temperature=85°C, Min Operating Temperature=-55°C, Package Quantity=4000, Supplier Part Number 1=2220Y1000562GCT-ND, Tolerance=10%, Voltage Rating=25V, Capacitance=4.7uF, Case Code (Imperial)=0603, Category="Ceramic Capacitors", ComponentLink1Description=https://datasheet.ciiva.com/48587/6print-detail-pdf-phplangenpart-noc1608x5r1e475k080acimp-unit-xmhz-48587141.pdf?src-supplier=Onlinecomponents.com, ComponentLink1URL=https://datasheet.ciiva.com/48587/6print-detail-pdf-phplangenpart-noc1608x5r1e475k080acimp-unit-xmhz-48587141.pdf?src-supplier=Onlinecomponents.com, ComponentLink2Description=https://datasheet.ciiva.com/24216/mlcc-commercial-general-en-24216326.pdf?src-supplier=Mouser, ComponentLink2URL=https://datasheet.ciiva.com/24216/mlcc-commercial-general-en-24216326.pdf?src-supplier=Mouser, ComponentLink3Description=https://datasheet.ciiva.com/48671/mlcc-commercial-general-en-48671304.pdf?src-supplier=Avnet, ComponentLink3URL=https://datasheet.ciiva.com/48671/mlcc-commercial-general-en-48671304.pdf?src-supplier=Avnet, Depth=0.8mm, Height=0.8mm, Lead Free="Lead Free", Length=1.6mm, Manufacturer Part Number=C1608X5R1E475KT000E, Mount="Surface Mount", Packaging="Tape and Reel", Pricing 2="100=0.23400, 200=0.21900, 1000=0.20700, 2000=0.18700 (GBP)", REACH SVHC="No SVHC", Resistor Type=Ceramic, RoHS=No, Stock 2=16120, Supplier 1=Digi-Key, Supplier 2=RSComponents, Supplier Part Number 2=9159158P, Termination=SMD/SMT, Thickness=0.039inch, Voltage Rating (DC)=25V, Weight=7.1E-05oz, Width=0.031inch
C20 C21: library part 06035A100JAT2A, "CAP CER 10PF 50V C0G/NP0 0603", Case/Package=0603, Dielectric=C0G, Insulation Resistance=100GR, Manufacturer="Kyocera AVX", Manufacturer Part Number=06035A100JAT2A/4K, Max Operating Temperature=125°C, Min Operating Temperature=-55°C, Supplier Part Number 1=478-1163-1-ND, Temperature Coefficient=30ppm/°C, Tolerance=5%, Voltage=50V, Capacitance=10pF, Depth=0.81mm, Height=0.9mm, Lead Free="Lead Free", Length=1.6mm, Mount="Surface Mount", Number of Pins=2, Packaging="Cut Tape", Pricing 1="1=0.1, 10=0.05, 50=0.0272, 100=0.0222, 500=0.01586, 1000=0.01246 (USD)", REACH SVHC="No SVHC", Stock 1=196463, Supplier 1=Digi-Key, Thickness=864um, Voltage Rating (DC)=50V, Width=810um
C22 C23: library part CL10C200JB8NNNC, "CAP CER 20PF 50V C0G/NP0 0603", Case/Package=0603, Case Code (Metric)=1608, Dielectric=C0G, Manufacturer=Samsung, Max Operating Temperature=125°C, Min Operating Temperature=-55°C, Package Quantity=1, Supplier Part Number 1=1276-1187-6-ND, Temperature Coefficient=300ppm/°C, Tolerance=5%, Voltage=50V, Capacitance=20pF, Case Code (Imperial)=0603, ComponentLink1Description=https://www.verical.com/server-webapp/html/getDatasheet?partID=640634&src-supplier=Verical, ComponentLink1URL=https://www.verical.com/server-webapp/html/getDatasheet?partID=640634&src-supplier=Verical, ComponentLink2Description=https://www.distrelec.biz/Web/Downloads/_e/ng/MLCC_CatalogDownload2013_ENG.pdf?mime=application%2Fpdf&src-supplier=Distrelec, ComponentLink2URL=https://www.distrelec.biz/Web/Downloads/_e/ng/MLCC_CatalogDownload2013_ENG.pdf?mime=application%2Fpdf&src-supplier=Distrelec, Depth=0.8mm, Height=0.8mm, Length=1.6mm, Manufacturer Part Number=CL10C200JB8NNNC, Mount="Surface Mount", Packaging="Tape and Reel", Pricing 1="1=0.1, 10=0.048, 100=0.0214, 500=0.0153, 1000=0.01202 (USD)", Radiation Hardening=No, Stock 1=591193, Supplier 1=Digi-Key, Thickness=0.035inch, Voltage Rating=50V, Width=0.031inch
C34: library part CC0603KRX7R0BB104, "CAP CER 0.1UF 100V X7R 0603", Capacitance=100nF, Case Code (Imperial)=0603, Case Code (Metric)=1608, Dielectric=X7R, Manufacturer=Yageo, Max Operating Temperature=125°C, Min Operating Temperature=-55°C, Package Quantity=4000, Resistor Type=Ceramic, Supplier Part Number 1=311-1523-1-ND, Tolerance=10%, Voltage Rating=100V, Case/Package=0603, Category="Ceramic Capacitors", ComponentLink1Description=https://datasheet.ciiva.com/6277/mlccorderingcode-6277030.pdf?src-supplier=Digi-Key, ComponentLink1URL=https://datasheet.ciiva.com/6277/mlccorderingcode-6277030.pdf?src-supplier=Digi-Key, ComponentLink2Description=https://datasheet.ciiva.com/6277/mlccorderingcode-6277081.pdf?src-supplier=Digi-Key, ComponentLink2URL=https://datasheet.ciiva.com/6277/mlccorderingcode-6277081.pdf?src-supplier=Digi-Key, ComponentLink3Description=https://datasheet.ciiva.com/6277/mlccorderingcode-6277082.pdf?src-supplier=Digi-Key, ComponentLink3URL=https://datasheet.ciiva.com/6277/mlccorderingcode-6277082.pdf?src-supplier=Digi-Key, Depth=0.8mm, Lead Free="Lead Free", Length=0.063inch, Manufacturer Part Number=CC0603KRX7R0BB104, Mount="Surface Mount", Packaging="Tape and Reel", Pricing 1="1=0.19000, 10=0.13500, 50=0.07680, 100=0.06370, 500=0.04466, 1000=0.03696 (USD)", RoHS=Yes, RoHS Compliant=Yes, Series=CC, Stock 1=60476, Supplier 1=Digi-Key, Termination=SMD/SMT, Thickness=0.035inch, Voltage Rating (DC)=100V, Weight=7.1E-05oz, Width=0.031inch
D1 D2 D3 D4: "DIODE ZENER 3.3V 200MW SOD323F", Forward Voltage=1V, Manufacturer="ON Semiconductor / Fairchild", Max Operating Temperature=150°C, Max Power Dissipation=200mW, Max Reverse Leakage Current=4.5uA, Min Operating Temperature=-65°C, Package Quantity=1, Supplier Part Number 1=MM3Z3V3BCT-ND, Test Current=5mA, Tolerance=2%, Working Voltage=3.3V, ComponentLink1Description=http://www.onsemi.com/pub/Collateral/MM3Z9V1B-D.pdf?src-supplier=Digi-Key, ComponentLink1URL=http://www.onsemi.com/pub/Collateral/MM3Z9V1B-D.pdf?src-supplier=Digi-Key, ComponentLink2Description=http://www.mouser.com/ds/2/149/MM3Z3V3B-187166.pdf?src-supplier=Mouser, ComponentLink2URL=http://www.mouser.com/ds/2/149/MM3Z3V3B-187166.pdf?src-supplier=Mouser, ComponentLink3Description=https://www.fairchildsemi.com/datasheets/MM/MM3Z9V1B.pdf?src-supplier=Avnet, ComponentLink3URL=https://www.fairchildsemi.com/datasheets/MM/MM3Z9V1B.pdf?src-supplier=Avnet, ComponentLink4Description=http://www.farnell.com/datasheets/1706525.pdf?src-supplier=Element14, ComponentLink4URL=http://www.farnell.com/datasheets/1706525.pdf?src-supplier=Element14, Element Configuration=Single, Height=1mm, Impedance=89R, Lead Free="Lead Free", Length=1.3mm, Manufacturer Part Number=MM3Z3V3B, Mount="Surface Mount", Number of Pins=2, Packaging="Tape and Reel", Peak Reverse Current=4.5uA, Power Dissipation=200mW, Pricing 1="1=0.22, 10=0.18, 100=0.0956, 500=0.06288, 1000=0.04276 (USD)", Radiation Hardening=No, REACH SVHC="No SVHC", Stock 1=473644, Supplier 1=Digi-Key, Voltage Tolerance=2%, Weight=0.0276g, Width=1.7mm, Zener Voltage=3.3V
D5 D6: "Schottky Rectifier, 60 V, 12 A, Dual Common Cathode, TO-252AA", Average Rectified Current=6A, Case/Package=TO-252AA, Forward Current=12A, Forward Voltage=790mV, Manufacturer="Vishay Semiconductors", Max Forward Surge Current (Ifsm)=320A, Max Operating Temperature=150°C, Max Repetitive Reverse Voltage (Vrrm)=60V, Max Reverse Current=3mA, Min Operating Temperature=-55°C, Supplier Part Number 1=99Y8339, Category="Rectifier Diodes", ComponentLink1Description=https://datasheet.ciiva.com/8289/12cwq06f-8289149.pdf?src-supplier=Avnet, ComponentLink1URL=https://datasheet.ciiva.com/8289/12cwq06f-8289149.pdf?src-supplier=Avnet, Element Configuration="Common Cathode", Manufacturer Part Number=VS-12CWQ06FNTR-M3, Max Reverse Voltage (DC)=60V, Mount="Surface Mount", Number of Pins=3, Packaging="Tape and Reel", Peak Non-Repetitive Surge Current=320A, Pricing 1="1=1.14000, 10=1.03000, 25=0.97800, 50=0.92000, 100=0.86500, 250=0.81400, 500=0.77000 (USD)", REACH SVHC="No SVHC", RoHS=Yes, RoHS Compliant=Yes, Series=-, Stock 1=119, Supplier 1=Avnet
J1 J2 J4 J5 J7: "CONN HEADER VERT 3POS 2.54MM", Color=Beige,White, Contact Current Rating=5A, Contact Resistance=6mR, Flammability Rating="UL94 V-0", Housing Color=Natural, Manufacturer="TE Connectivity", Max Operating Temperature=221°C, Max Voltage Rating (AC)=250V, Min Operating Temperature=-67°C, Package Quantity=5000, Supplier Part Number 1=1320361P, Approvals=CSA, Backwall/Post Interruptions="No (Without)", Category=Connectors, Circuit Application=Signal, ComponentLink1Description=https://datasheet.ciiva.com/11746/0900766b80027008-11746172.pdf?src-supplier=RSComponents, ComponentLink1URL=https://datasheet.ciiva.com/11746/0900766b80027008-11746172.pdf?src-supplier=RSComponents, ComponentLink2Description=https://datasheet.ciiva.com/6005/1712135-6005440.pdf?src-supplier=Farnell, ComponentLink2URL=https://datasheet.ciiva.com/6005/1712135-6005440.pdf?src-supplier=Farnell, ComponentLink3Description=https://datasheet.ciiva.com/19474/613940-19474164.pdf?src-supplier=Jameco, ComponentLink3URL=https://datasheet.ciiva.com/19474/613940-19474164.pdf?src-supplier=Jameco, ComponentLink4Description=https://datasheet.ciiva.com/16456/eng-ds-82056-mta-0608-16456886.pdf?src-supplier=Future+Electronics, ComponentLink4URL=https://datasheet.ciiva.com/16456/eng-ds-82056-mta-0608-16456886.pdf?src-supplier=Future+Electronics, ComponentLink5Description=https://datasheet.ciiva.com/14156/04384301-14156821.pdf?src-supplier=Distrelec, ComponentLink5URL=https://datasheet.ciiva.com/14156/04384301-14156821.pdf?src-supplier=Distrelec, ComponentLink6Description=https://datasheet.ciiva.com/16656/eng-ds-82056-mta-0608-16656523.pdf?src-supplier=Avnet+Europe, ComponentLink6URL=https://datasheet.ciiva.com/16656/eng-ds-82056-mta-0608-16656523.pdf?src-supplier=Avnet+Europe, ComponentLink7Description=https://datasheet.ciiva.com/30127/8852eng-ds-82056-mta-0608-30127480.pdf?src-supplier=Onlinecomponents.com, ComponentLink7URL=https://datasheet.ciiva.com/30127/8852eng-ds-82056-mta-0608-30127480.pdf?src-supplier=Onlinecomponents.com, ComponentLink8Description=https://datasheet.ciiva.com/14637/70083643-14637750.pdf?src-supplier=Allied+Electronics, ComponentLink8URL=https://datasheet.ciiva.com/14637/70083643-14637750.pdf?src-supplier=Allied+Electronics, ComponentLink9Description=https://datasheet.ciiva.com/7128/eng-ds-82056-mta-0608-7128744.pdf?src-supplier=Newark, ComponentLink9URL=https://datasheet.ciiva.com/7128/eng-ds-82056-mta-0608-7128744.pdf?src-supplier=Newark, ComponentLink10Description=https://datasheet.ciiva.com/709/eng-cd-640456-w2-709688.pdf?src-supplier=Digi-Key, ComponentLink10URL=https://datasheet.ciiva.com/709/eng-cd-640456-w2-709688.pdf?src-supplier=Digi-Key, Connector System=Wire-to-Board, Connector Type=Connector,Pin,Plug,Header, Contact Finish - Mating=TIN, Contact Gender=Male, Contact Material="Copper Alloy", Contact Mating Length=7.49mm, Contact Plating=Tin, Contact Post Length=3.56mm, Contact Retention="No (Without)", Contact Shape=Square, Contact Style=Straight, Contact Type="Male Pin", Current Rating=5A, Depth=5.72mm, ELV=Compliant, Fastening Type=Friction, Gender=Male, Height=7.87mm, Housing Material=Polyester, Insulation Color=Natural, Insulation Material=Thermoplastic, Lead Free="Lead Free", Length=0.4inch, Manufacturer Part Number=640456-3, Mating Alignment="No (Without)", Mating Connector Lock="Yes (With)", Mating Retention="No (Without)", Mount="Through Hole", Mounting Ears="No (Without)", Number of Contacts=3, Number of Positions=3, Number of Rows=1, Orientation=Straight, Packaging=Bulk, Panel Mount Retention="No (Without)", PCB Mount Alignment="No (Without)", PCB Mounting Orientation=Vertical, PCB Mount Retention=Without, PCB Thickness=0.063inch, Pitch=2.54mm, Plating Thickness=3.81um, Pricing 1="250=0.08100, 1000=0.07000, 5000=0.05800, 10000=0.05400 (GBP)", Radiation Hardening=No, REACH SVHC=Unknown, RoHS=Yes, RoHS Compliant=Yes, Sealable="No (Without)", Series=MTA-100, Shrouded="No (Without)", Stock 1=8977, Strain Relief="No (Without)", Supplier 1=RSComponents, Tail Length=0.14inch, Termination=Solder, Voltage Rating=250V, Voltage Rating (AC)=250V
J3: "P=5.0mm Screw terminal ROHS", Manufacturer="Ningbo Kangnex Elec", Package=Custom, ComponentLink1Description=LCSC, ComponentLink1URL=https://www.lcsc.com/product-detail/Screw-span-style-background-color-ff0-terminal-span_Ningbo-Kangnex-Elec-WJ126V-5-0-6P_C8379.html, Manufacturer Part No=WJ126V-5.0-6P
J6: "SD Card Connector SMD", Manufacturer=SOFNG, Card Connection Mode=Pluggable, Card Type=MicroSD, ComponentLink1Description=LCSC, ComponentLink1URL=https://lcsc.com/product-detail/SD-Card-Connectors_SOFNG-TF-002T-15_C125616.html
J8: "CONN RCPT USB2.0 MICRO B SMD R/A", Color=Black, Current Rating=1.8A, Flammability Rating="UL94 V-0", Insulation Resistance=1GR, Manufacturer="Amphenol FCI", Max Operating Temperature=85°C, Max Voltage Rating (AC)=100V, Min Operating Temperature=-55°C, Package Quantity=9600, Supplier Part Number 1=609-4618-1-ND, ComponentLink1Description=http://www.amphenol-icc.com/media/wysiwyg/files/drawing/10118194.pdf?src-supplier=Digi-Key, ComponentLink1URL=http://www.amphenol-icc.com/media/wysiwyg/files/drawing/10118194.pdf?src-supplier=Digi-Key, ComponentLink2Description=https://cdn.amphenol-icc.com/media/wysiwyg/files/drawing/10118194.pdf?src-supplier=Mouser, ComponentLink2URL=https://cdn.amphenol-icc.com/media/wysiwyg/files/drawing/10118194.pdf?src-supplier=Mouser, ComponentLink3Description=https://cdn.amphenol-icc.com/media/wysiwyg/files/drawing/10118194.pdf?src-supplier=Verical, ComponentLink3URL=https://cdn.amphenol-icc.com/media/wysiwyg/files/drawing/10118194.pdf?src-supplier=Verical, Connector Type=USB,Receptacle, Contact Material="Copper Alloy", Contact Plating=Gold, Depth=5mm, Features=Shielded, Gender=Receptacle, Housing Material=Polymer, Lead Free="Lead Free", Length=8.05mm, Manufacturer Part Number=10118194-0001LF, Mount="Surface Mount,Horizontal", Number of Contacts=5, Number of Ports=1, Number of Terminals=5, Orientation="Right Angle", Packaging="Tape and Reel", Pitch=0.65mm, Pricing 1="1=0.43, 10=0.405, 25=0.3648, 50=0.3242, 100=0.3107, 250=0.28368, 500=0.27016 (USD)", Radiation Hardening=No, Stock 1=35943, Supplier 1=Digi-Key, Termination=Solder
L1: library part IHLP2525CZER3R3M01, "Ind High Current Shielded 3.3uH 20% 100KHz 6A 2525 T/R", Case Code (Imperial)=2525, Case Code (Metric)=6363, Current Rating=6A, DC Resistance (DCR)=30mR, Inductance=3.3uH, Inductance Tolerance=20%, Manufacturer="Vishay Dale", Max Operating Temperature=125°C, Min Operating Temperature=-55°C, Package Quantity=2000, Saturation Current=13.5A, Self Resonant Frequency=5MHz, Supplier Part Number 1=541-1009-1-ND, Test Frequency=100kHz, Case/Package=2525, Category="Fixed Inductors", Contact Plating=Tin, Core Material=Ferrite, Depth=6.72mm, Height=3mm, Height - Seated (Max)=0.118inch, Lead Free="Lead Free", Length=6.47mm, Manufacturer Part Number=IHLP2525CZER3R3M01, Max DC Current=6A, Military Standard=Not, Mount="Surface Mount", Number of Pins=2, Packaging="Tape and Reel", Pricing 1="1=1.31000, 10=1.21600, 25=1.12200, 50=0.93500, 100=0.87890, 250=0.78540, 500=0.67320, 1000=0.59840 (USD)", Radiation Hardening=No, Rated Current-Max=6A, REACH SVHC=Unknown, RMS Current (Irms)=6A, RoHS=Yes, RoHS Compliant=Yes, Series=IHLP-2525CZ-01, Shielding=Shielded, Stock 1=8419, Supplier 1=Digi-Key, Termination=SMD/SMT, Tolerance=20%, Width=6.47mm
Q1: "TRANS NPN 40V 0.6A SMD SOT23-3", Case/Package=SOT-23, Collector Base Voltage (VCBO)=75V, Collector Emitter Breakdown Voltage=40V, Collector Emitter Saturation Voltage=1V, Continuous Collector Current=600mA, Current=1A, Emitter Base Voltage (VEBO)=6V, Frequency=300MHz, Manufacturer=Diodes, Max Operating Temperature=150°C, Max Power Dissipation=300mW, Min Operating Temperature=-55°C, Package Quantity=3000, Power Dissipation=350mW, Supplier Part Number 1=MMBT2222A-FDIDKR-ND, Collector Emitter Voltage (VCEO)=40V, ComponentLink1Description=http://www.diodes.com/datasheets/ds30041.pdf?src-supplier=Future+Electronics, ComponentLink1URL=http://www.diodes.com/datasheets/ds30041.pdf?src-supplier=Future+Electronics, ComponentLink2Description=http://www.diodes.com/datasheets/ds30041.pdf?src-supplier=Avnet, ComponentLink2URL=http://www.diodes.com/datasheets/ds30041.pdf?src-supplier=Avnet, ComponentLink3Description=https://www.verical.com/server-webapp/html/getDatasheet?partID=82692&src-supplier=Verical, ComponentLink3URL=https://www.verical.com/server-webapp/html/getDatasheet?partID=82692&src-supplier=Verical, ComponentLink4Description=https://www.diodes.com/assets/Datasheets/ds30041.pdf?src-supplier=Digi-Key, ComponentLink4URL=https://www.diodes.com/assets/Datasheets/ds30041.pdf?src-supplier=Digi-Key, ComponentLink5Description=http://www.diodes.com/datasheets/ds30041.pdf?src-supplier=Avnet+Europe, ComponentLink5URL=http://www.diodes.com/datasheets/ds30041.pdf?src-supplier=Avnet+Europe, ComponentLink6Description=http://www.diodes.com/datasheets/ds30041.pdf?src-supplier=Element14, ComponentLink6URL=http://www.diodes.com/datasheets/ds30041.pdf?src-supplier=Element14, Contact Plating=Matte,Tin, Current Rating=600mA, Element Configuration=Single, Gain Bandwidth Product=300MHz, Height=1mm, hFE Min=100, Lead Free="Lead Free", Length=3.05mm, Manufacturer Part Number=MMBT2222A-7-F, Max Breakdown Voltage=40V, Max Collector Current=600mA, Max Frequency=300MHz, Mount="Surface Mount", Number of Elements=1, Number of Pins=3, Packaging="Tape and Reel", Polarity=NPN, Pricing 1="1=0.15, 10=0.134, 100=0.0729, 500=0.04486, 1000=0.03059 (USD)", Radiation Hardening=No, REACH SVHC="No SVHC", Stock 1=2471182, Supplier 1=Digi-Key, Termination=SMD/SMT, Transition Frequency=300MHz, Voltage=40V, Voltage Rating (DC)=40V, Weight=0.000282oz, Width=1.4mm
R1: library part CR0603-FX-1691ELF, "RES SMD 1.69K 0.1W 0603", Case/Package=0603, Case Code (Metric)=1608, Manufacturer=Bourns, Max Operating Temperature=155°C, Max Power Dissipation=100mW, Min Operating Temperature=-55°C, Package Quantity=5000, Resistance=1.69kR, Resistor Type="Thick Film", Supplier Part Number 1=CR0603-FX-1691ELFCT-ND, Temperature Coefficient=100ppm/°C, Tolerance=1%, Voltage Rating=50V, Case Code (Imperial)=0603, Category="Chip SMD Resistors", ComponentLink1Description=http://components.arrow.com/part/dataview/0323_00459241?src-supplier=Arrow+Europe, ComponentLink1URL=http://components.arrow.com/part/dataview/0323_00459241?src-supplier=Arrow+Europe, ComponentLink2Description=http://www.mouser.com/ds/2/54/chpreztr-977002.pdf?src-supplier=Mouser, ComponentLink2URL=http://www.mouser.com/ds/2/54/chpreztr-977002.pdf?src-supplier=Mouser, ComponentLink3Description=http://www.onlinecomponents.com/datasheet/cr0603-fx-1691elf.aspx?p=10743832&src-supplier=Onlinecomponents.com, ComponentLink3URL=http://www.onlinecomponents.com/datasheet/cr0603-fx-1691elf.aspx?p=10743832&src-supplier=Onlinecomponents.com, ComponentLink4Description=http://components.arrow.com/part/dataview/40997510S2955917N1506?src-supplier=Arrow+Electronics, ComponentLink4URL=http://components.arrow.com/part/dataview/40997510S2955917N1506?src-supplier=Arrow+Electronics, ComponentLink5Description=http://www.bourns.com/docs/Product-Datasheets/CHPREZTR.pdf?src-supplier=Digi-Key, ComponentLink5URL=http://www.bourns.com/docs/Product-Datasheets/CHPREZTR.pdf?src-supplier=Digi-Key, ComponentLink6Description=http://www.bourns.com/pdfs/chpreztr.pdf?src-supplier=Avnet, ComponentLink6URL=http://www.bourns.com/pdfs/chpreztr.pdf?src-supplier=Avnet, ComponentLink7Description=https://www.bourns.com/docs/Product-Datasheets/CHPREZTR.pdf?src-supplier=Digi-Key, ComponentLink7URL=https://www.bourns.com/docs/Product-Datasheets/CHPREZTR.pdf?src-supplier=Digi-Key, Construction=Rectangular, Contact Plating=Tin, Depth=0.8mm, Features="Moisture Resistant", Height=0.022inch, Length=1.6mm, Manufacturer Part Number=CR0603-FX-1691ELF, Military Standard=Not, Mount="Surface Mount", Number of Terminations=2, Packaging="Tape and Reel", Power Rating=100mW, Pricing 1="1=0.10000, 10=0.03300, 100=0.01360, 1000=0.00610, 2500=0.00529 (USD)", Radiation Hardening=No, RoHS=Yes, RoHS Compliant=Yes, Series=CR0603, Stock 1=21457, Supplier 1=Digi-Key, Termination=SMD/SMT, Thickness=457um, Width=0.031inch
R2: library part CRGH0603J100K, "RES SMD 100K OHM 5% 1/5W 0603", Case/Package=0603, Case Code (Metric)=1608, Manufacturer="TE Connectivity", Max Operating Temperature=125°C, Min Operating Temperature=-55°C, Number of Resistors=1, Power Rating=200mW, Resistance=100kR, Resistance Tolerance=5%, Resistor Type="Thick Film,Power resistor", Supplier Part Number 1=A126393DKR-ND, Temperature Coefficient=100ppm/°C, Voltage Rating=50V, Case Code (Imperial)=0603, ComponentLink1Description=http://www.farnell.com/datasheets/2007183.pdf?src-supplier=Element14, ComponentLink1URL=http://www.farnell.com/datasheets/2007183.pdf?src-supplier=Element14, Depth=0.8mm, ELV=Compliant, Height=0.45mm, Length=1.6mm, Manufacturer Part Number=CRGH0603J100K, Mount="Surface Mount", Number of Terminations=2, Packaging="Tape and Reel", Pricing 1="1=0.1, 10=0.049, 100=0.02, 1000=0.00899, 2500=0.0078 (USD)", REACH SVHC="No SVHC", RoHS Compliant=Yes, Series=CRGH, Stock 1=23277, Supplier 1=Digi-Key, Technology="THICK FILM", Termination=Solder, Tolerance=5%, Voltage Rating (DC)=50V, Width=0.8mm
R3: library part RC0603JR-0756KL, "RES SMD 0603 56K Ohm 5% 0.1W", Case/Package=0603, Case Code (Metric)=1608, Manufacturer=Yageo, Max Operating Temperature=155°C, Max Power Dissipation=100mW, Min Operating Temperature=-55°C, Package Quantity=1, Resistance=56kR, Resistance Tolerance=5%, Resistor Type="Thick Film", Supplier Part Number 1=311-56KGRCT-ND, Temperature Coefficient=100ppm/°C, Voltage Rating=50V, Working Voltage=75V, Case Code (Imperial)=0603, Category="Chip SMD Resistors", ComponentLink1Description=https://datasheet.ciiva.com/7746/443971-7746519.pdf?src-supplier=Element14, ComponentLink1URL=https://datasheet.ciiva.com/7746/443971-7746519.pdf?src-supplier=Element14, ComponentLink2Description=https://datasheet.ciiva.com/15189/getdatasheetpartid-326541-15189879.pdf?src-supplier=Verical, ComponentLink2URL=https://datasheet.ciiva.com/15189/getdatasheetpartid-326541-15189879.pdf?src-supplier=Verical, ComponentLink3Description=https://datasheet.ciiva.com/7746/443971-7746520.pdf?src-supplier=Element14, ComponentLink3URL=https://datasheet.ciiva.com/7746/443971-7746520.pdf?src-supplier=Element14, ComponentLink4Description=https://datasheet.ciiva.com/2452/pyu-r-int-thick-7-2452986.pdf?src-supplier=Digi-Key, ComponentLink4URL=https://datasheet.ciiva.com/2452/pyu-r-int-thick-7-2452986.pdf?src-supplier=Digi-Key, ComponentLink5Description=https://datasheet.ciiva.com/2452/pyu-r-int-thick-7-2452987.pdf?src-supplier=Digi-Key, ComponentLink5URL=https://datasheet.ciiva.com/2452/pyu-r-int-thick-7-2452987.pdf?src-supplier=Digi-Key, ComponentLink6Description=https://datasheet.ciiva.com/2452/pyu-r-int-thick-7-2452988.pdf?src-supplier=Digi-Key, ComponentLink6URL=https://datasheet.ciiva.com/2452/pyu-r-int-thick-7-2452988.pdf?src-supplier=Digi-Key, Construction=Rectangular, Depth=0.8mm, Features="Moisture Resistant", Height=0.022inch, Lead Free="Lead Free", Length=1.6mm, Manufacturer Part Number=RC0603JR-0756KL, Military Standard=Not, Number of Pins=2, Number of Terminations=2, Packaging="Tape and Reel", Power Rating=100mW, Pricing 1="1=0.10000, 10=0.02000, 100=0.00800, 1000=0.00360, 2500=0.00312 (USD)", REACH SVHC="No SVHC", RoHS=Yes, RoHS Compliant=Yes, Series=RC, Stock 1=305962, Supplier 1=Digi-Key, Technology="THICK FILM", Termination=SMD/SMT, Tolerance=5%, Voltage Rating (DC)=50V, Width=0.031inch